# Altium PCB LTE-Module.PcbDoc (part 2 of 2)
Units mm, origin at the board's own origin, x right, y up, seen from the top; angles counter-clockwise.
Board outline 33 x 53 mm, 2 copper layers (Top Layer, Bottom Layer), stack 0.97 mm thick; 55 components, 48 nets, 277 pads, 102 vias.
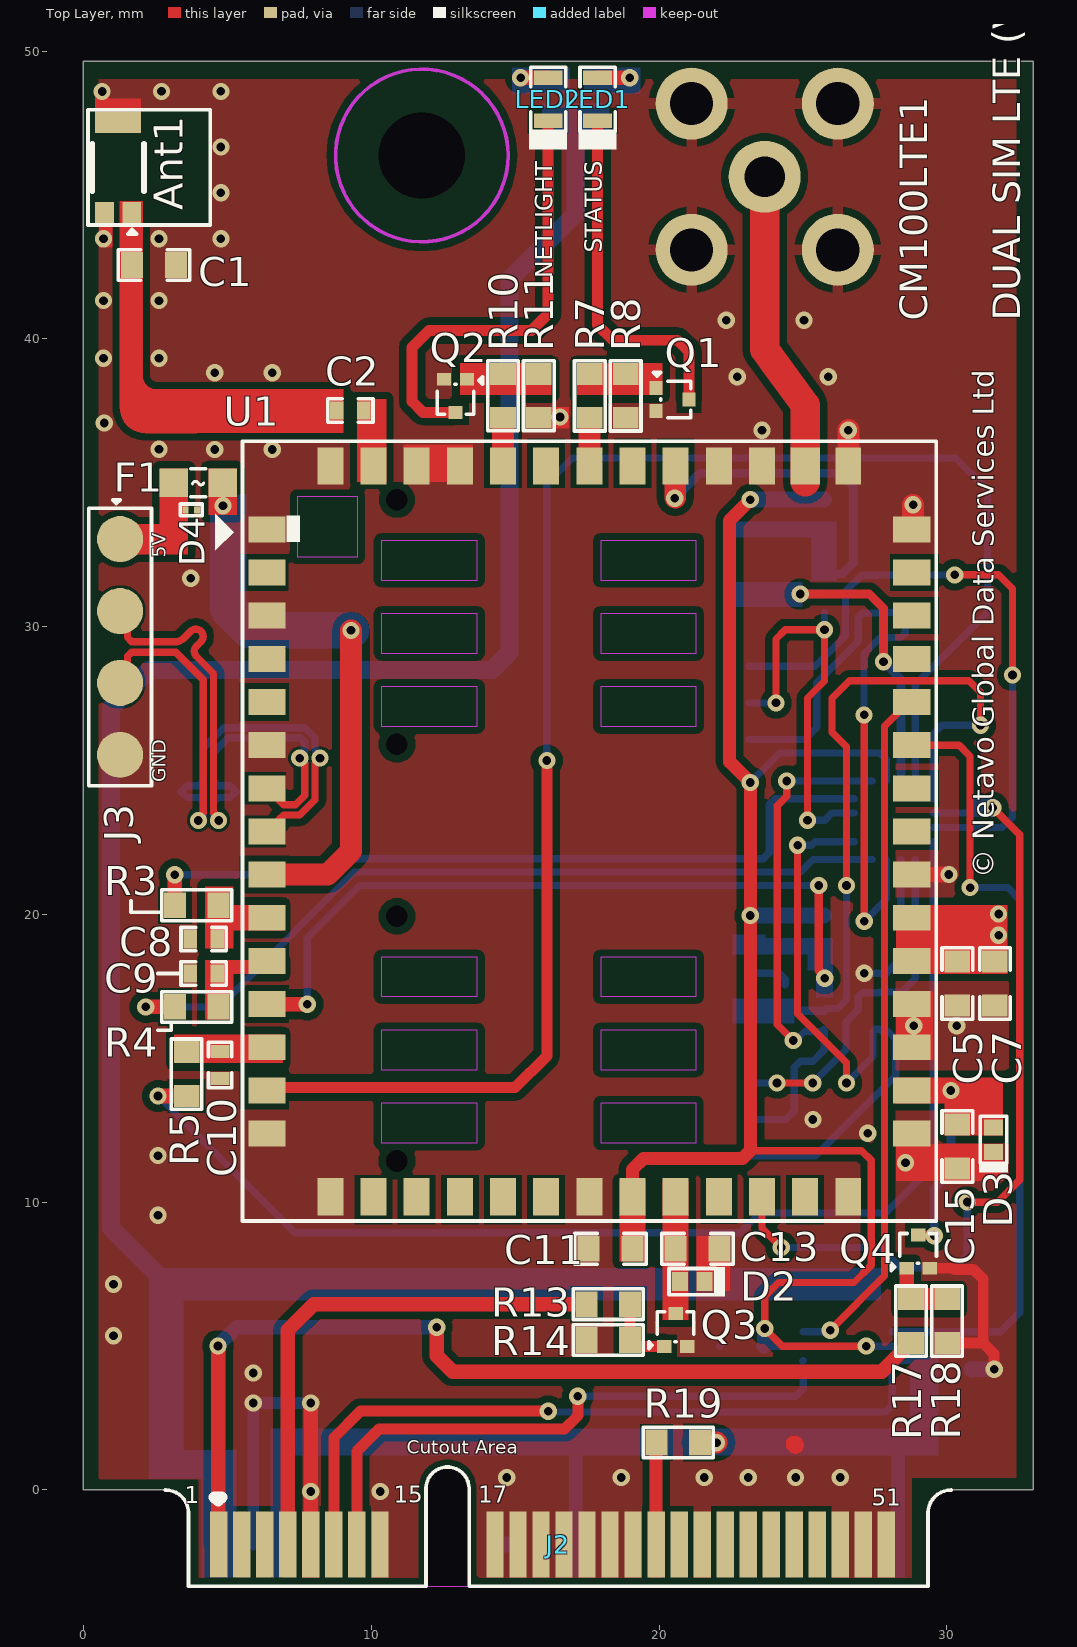
[diagram p0: Top Layer view]

## Via types
v1: diameter 0.6, hole 0.3, Top Layer to Bottom Layer, 102 vias

## Nets (pads, with @x,y where several pads share a name; then routed paths per layer and width w, separated by ;. In a path a pad name is that pad's centre, name@x,y a point inside that pad or via, vN(x,y) a via of type N, cw(c..) or ccw(c..) an arc to the next point about the centre after c; other vN are vias at no path point) (continued)
GND: (continued)
  other v1: 7.899,-0.051 10.312,-0.051 21.576,0.432 23.1,0.432 24.746,0.432 26.3,0.432 5.9,4.064 1.041,5.359 1.041,7.15 2.591,9.55 28.566,11.375 2.591,11.62 27.25,12.398 25.349,12.874 28.854,16.129 30.347,16.129 3.729,31.68 4.56,36.157 6.56,36.157 2.626,36.164 23.578,36.83 0.726,37.078 16.561,37.287 22.717,38.682 25.878,38.682 4.56,38.824 6.56,38.824 0.696,39.333 2.626,39.333 22.339,40.646 25.038,40.646 0.696,41.333 2.626,41.333 0.696,43.485 2.626,43.485 4.775,43.485 4.775,45.078 4.775,46.672 0.647,48.598 2.711,48.602 4.775,48.602
GNSS_ANT: Ant1.1 C1.2 C2.2
GSM_PWR: C5.2 C6.1 C7.1 D1.2 J2.2 R6.1 R9.1 U1.33 U1.34 | length 66.9
  Top Layer w0.254: 30.251,19.939 30.696,19.939 31.356,19.278 v1(31.801,19.278) 31.801,19.99 31.775,20.015 v1@31.801,20.041
  Bottom Layer w0.635: C6.1@12.001,7.15 9.144,7.15 2.845,7.15 2.591,7.404 2.591,7.466 0.952,9.104 0.952,27.181 2.271,28.499 14.199,28.499 14.808,29.108 14.808,42.062 17.109,44.363 17.109,46.979 16.737,47.351 16.523,47.351 R9.1
  other v1: 31.801,20.015
GSM_PWR_EN: J2.1 R17.1 | length 32.9
  Top Layer w0.508: v1(4.674,5.004) 4.687,4.991 4.687,-1.887 J2.1 ; v1(12.276,5.657) 12.276,4.666 12.827,4.115 27.746,4.115 28.566,4.935 28.566,4.978 28.693,5.105 R17.1
  Bottom Layer w0.508: v1(4.674,5.004) 5.327,5.657 v1(12.276,5.657)
GSM_RST: J2.7 R13.1 | length 18.2
  Top Layer w0.508: J2.7 7.1,5.551 8.007,6.457 R13.1
GSM_RX: U1.39 U5.4 | length 24
  Top Layer w0.254: v1(25.951,5.554) 27.838,7.441 27.838,26.544 28.678,27.384 U1.39
  Bottom Layer w0.254: U5.4 25.897,5.5 v1(25.951,5.554)
GSM_TX: U1.38 U5.5 | length 27.7
  Top Layer w0.254: U1.38@28.779,25.883 30.429,25.883 30.81,25.502 v1(30.81,20.934)
  Bottom Layer w0.254: U5.5 31.87,5.5 32.537,6.167 32.537,20.512 32.116,20.934 v1(30.81,20.934)
GSM_USB_D_N: D5.2 J3.2 U1.7 | length 21.6
  Top Layer w0.254: J3.2 1.528,30.288 1.528,29.622 1.676,29.473 2.995,29.473 3.175,29.473 ccw(c3.175,29.907) 3.481,29.6 3.723,29.841 cw(c3.902,29.662) 4.082,29.841 cw(c3.903,29.662) 4.082,29.482 3.926,29.326 ccw(c4.106,29.147) 3.926,28.967 4.483,28.41 4.521,28.372 4.521,23.533 4.694,23.36 v1(4.694,23.266) ; U1.7 6.478,24.384 6.801,24.061 6.801,23.961 6.95,23.812 7.37,23.812 7.691,24.134 7.691,25.261 v1(7.518,25.434)
  Bottom Layer w0.254: v1(4.694,23.266) 4.521,23.439 4.521,23.915 4.67,24.063 5.09,24.063 D5.2 5.09,24.469 4.67,24.469 4.521,24.618 4.521,25.632 5.026,26.137 7.543,26.137 7.691,25.988 7.691,25.701 7.518,25.528 v1(7.518,25.434)
GSM_USB_D_P: D5.1 J3.3 U1.8 | length 21.6
  Top Layer w0.254: J3.3 1.528,28.303 1.528,28.969 1.676,29.118 3.205,29.118 4.166,28.157 4.166,23.533 3.993,23.36 v1(3.993,23.266) ; U1.8 6.478,22.884 6.801,23.207 6.801,23.307 6.95,23.456 7.517,23.456 8.047,23.986 8.047,25.261 v1(8.22,25.434)
  Bottom Layer w0.254: v1(3.993,23.266) 4.166,23.439 4.166,23.915 4.017,24.063 3.596,24.063 D5.1 3.596,24.469 4.017,24.469 4.166,24.618 4.166,25.78 4.878,26.492 7.69,26.492 8.047,26.135 8.047,25.701 8.22,25.528 v1(8.22,25.434)
MCU_RX: J2.11 U5.8 | length 24.7
  Top Layer w0.381: J2.11 8.7,1.817 9.624,2.74 v1(16.149,2.74)
  Bottom Layer w0.254: v1(16.149,2.74) 16.183,2.707 27.878,2.707 28.111,2.939 U5.8
MCU_TX: J2.13 U5.1 | length 20.5
  Top Layer w0.381: J2.13 9.5,1.36 10.263,2.123 16.722,2.123 17.18,2.581 v1(17.18,3.261)
  Bottom Layer w0.254: v1(17.18,3.261) 24.759,3.261 25.011,3.513 U5.1
NetC2_1: C2.1 U1.55
NetC8_2: C8.2 R3.2 U1.10 | length 0
  Top Layer w0.381: U1.10@6.376,19.886 U1.10
NetC9_2: C9.2 R4.1 U1.11
NetC10_2: C10.2 R5.2 U1.13 | length 1.5
  Top Layer w0.381: C10.2@4.902,15.418 6.344,15.418 U1.13
NetD4_1: D4.1 F1.2 J3.1
NetLED1_1: LED1.1 R6.2 | length 1.6
  Top Layer w0.508: LED1.1 v1(18.981,49.079)
  Bottom Layer w0.508: 18.479,49.079 v1(18.981,49.079)
NetLED1_2: LED1.2 Q1.3 | length 12.3
  Top Layer w0.381: LED1.2 17.866,40.483 18.395,39.954 20.649,39.954 21.04,39.564 Q1.3
NetLED2_1: LED2.1 R9.2 | length 1
  Top Layer w0.508: v1@15.189,49.083 15.191,49.081 16.146,49.081 LED2.1
  other v1: 15.189,49.079
NetLED2_2: LED2.2 Q2.3 | length 15.4
  Top Layer w0.381: Q2.3@12.904,37.449 11.802,37.449 11.418,37.833 11.418,39.704 12.007,40.294 15.569,40.294 16.148,40.873 LED2.2
NETLIGHT: R10.1 U1.52 | length 1.7
  Top Layer w0.762: U1.52@14.58,35.585 R10.1
NetQ1_1: Q1.1 R7.2 R8.2 | length 2.1
  Top Layer w0.508: R7.2 R8.2 18.966,38.658 19.592,38.658
NetQ2_1: Q2.1 R10.2 R11.2
NetQ3_1: Q3.1 R13.2 R14.2 | length 2.5
  Top Layer w0.381: R13.2 R14.2 18.999,5.178 19.19,4.988 Q3.1
NetQ4_1: Q4.1 R17.2 R18.2
PWRKEY: C15.2 D3.2 Q4.3 U1.30 | length 7.2
  Top Layer w0.305: U1.30 v1(30.144,13.884) ; Q4.3 29.015,8.847 29.557,8.847 v1(29.566,8.839)
  Bottom Layer w0.305: v1(29.566,8.839) 29.566,10.484 30.144,11.062 v1(30.144,13.884)
RF_ANT: J1.1 U1.45 | length 11.1
  Top Layer w1.016: J1.1 23.673,40.131 23.673,39.635 23.965,39.234 25.078,37.704 U1.45 U1.45@25.078,35.034
RST_GSM: C13.2 D2.2 Q3.3 U1.24 | length 4.5
  Top Layer w0.305: 20.443,7.239 20.458,7.239 ; Q3.3 D2.2@20.578,7.449 ; U1.24 20.578,7.569 ; 20.733,7.569 20.578,7.569 ; D2.2@20.578,7.449 20.578,7.569 ; D2.2@20.578,7.449 20.458,7.569 20.578,7.569
SIM_CD_B1: J5.CD R1.2 U1.12 U3.6 | length 25.5
  Top Layer w0.305: v1(25.552,21.006) 25.552,18.063 25.756,17.86 v1(25.756,17.78)
  Top Layer w0.508: U1.12 v1(7.778,16.884)
  Bottom Layer w0.254: v1(7.778,16.884) 7.778,19.182 9.601,21.006 v1(25.552,21.006)
SIM_CD_B2: J4.CD R2.2 U1.48 U4.6 | length 11.8
  Top Layer w0.381: v1(20.549,34.468) v1@20.563,34.483 ; U1.48@20.563,35.569 U1.48
  Top Layer w0.762: v1@20.563,34.483 U1.48@20.563,35.569
  Bottom Layer w0.305: v1(20.549,34.468) 21.415,35.334 26.301,35.334 26.757,34.878 26.757,32.217 26.377,31.838 25.798,31.838 U4.6
  Bottom Layer w0.381: J4.CD@23.067,33.438 J4.CD
SIM_CLK: R4.2 U2.8 | length 28.4
  Top Layer w0.508: v1(2.167,16.787) R4.2
  Bottom Layer w0.254: v1(2.167,16.787) 4.722,16.787 9.412,21.477 24.923,21.477 25.354,21.908 U2.8
SIM_CLK_B1: J5.C3 U2.9 U3.3 | length 21.7
  Top Layer w0.254: v1(24.816,22.403) 24.816,16.546 26.518,14.845 v1(26.518,14.144)
  Bottom Layer w0.254: J5.C3 25.432,11.604 28.233,14.404 28.233,15.673 27.972,15.933 27.757,15.933 U3.3 27.509,16.006 27.436,15.933 27.436,15.062 v1(26.518,14.144) ; v1(24.816,22.403) 25.3,22.403 25.42,22.523 U2.9
SIM_CLK_B2: J4.C3 U2.7 U4.3 | length 22.5
  Top Layer w0.254: v1@27.127,26.687 27.127,19.766 v1(27.132,19.761)
  Bottom Layer w0.254: J4.C3 25.07,26.082 25.486,26.499 25.486,28.052 26.923,29.489 26.923,30.329 27.072,30.478 27.679,30.478 U4.3 28.398,30.49 28.555,30.333 28.555,29.777 28.405,29.627 27.691,29.627 27.127,29.063 v1(27.127,26.934) ; v1(27.132,19.761) 27.132,19.766 27.902,20.536 27.902,21.905 U2.7
SIM_DATA: R3.1 U2.12 | length 26.7
  Top Layer w0.508: R3.1 v1(3.175,21.384)
  Bottom Layer w0.254: v1(3.175,21.384) 8.608,21.384 9.16,21.937 23.625,21.937 23.832,22.144 23.832,23.812 24.043,24.023 U2.12
SIM_DATA_B1: J5.C7 U2.13 U3.4 | length 18.8
  Top Layer w0.254: v1(24.435,24.638) 24.435,24.105 24.108,23.778 24.108,16.176 v1(24.663,15.621)
  Bottom Layer w0.254: J5.C7 24.404,12.874 24.695,13.165 24.695,14.69 24.904,14.899 25.349,14.899 25.744,15.295 U3.4 25.671,15.933 25.059,15.933 24.747,15.621 v1(24.663,15.621) ; v1(24.435,24.638) U2.13
SIM_DATA_B2: J4.C7 U2.11 U4.4 | length 14.2
  Top Layer w0.254: v1(24.067,27.352) 24.067,29.575 24.384,29.892 v1(25.752,29.892) 25.752,28.114 25.159,27.521 v1(25.159,23.273)
  Bottom Layer w0.254: J4.C7 v1(24.067,27.352) ; v1(25.159,23.273) 25.756,23.273 26.006,23.523 U2.11 ; v1(25.752,29.892) U4.4
SIM_RST: R5.1 U2.4 | length 42.1
  Top Layer w0.508: v1(2.591,13.691) R5.1
  Bottom Layer w0.254: v1(2.591,13.691) 7.341,8.941 22.819,8.941 23.507,9.629 27.882,9.629 29.52,11.267 U2.4
SIM_RST_B1: J5.C2 U2.5 U3.1 | length 12.2
  Top Layer w0.254: v1(24.101,14.144) v1(25.344,14.144)
  Bottom Layer w0.254: J5.C2 v1(24.101,14.144) ; v1(25.344,14.144) 26.495,15.295 26.495,16.262 26.927,16.693 26.927,17.135 27.076,17.284 27.662,17.284 U3.1 28.438,17.306 28.905,17.773 U2.5
SIM_RST_B2: J4.C2 U2.3 U4.1 | length 22.4
  Top Layer w0.254: v1(30.277,31.801) 31.801,31.801 32.283,31.318 v1(32.283,28.321)
  Bottom Layer w0.254: J4.C2 25.422,28.622 26.481,29.681 26.481,31.229 27.043,31.79 U4.1 27.696,31.796 30.272,31.796 v1(30.277,31.801) ; U2.3 31.933,23.023 32.283,23.373 v1(32.283,28.321)
SIM_SELECT: R12.1 U1.26 U2.2 | length 28.5
  Top Layer w0.254: U1.26 23.578,9.1 v1(24.252,8.426) ; v1(30.709,10.008) 30.713,10.003 31.761,10.003 32.537,10.78 32.537,22.765 v1(31.598,23.705)
  Bottom Layer w0.254: v1(24.252,8.426) 27.703,8.426 28.403,7.726 30.279,7.726 30.709,8.156 v1(30.709,10.008) ; U2.2 30.996,23.523 R12.1@31.07,23.597
  Bottom Layer w0.635: R12.1 v1(31.598,23.705)
SIM_VCC_B1: C12.2 J5.C1 U2.1 U3.5 | length 23.7
  Top Layer w0.254: v1(26.518,21.006) 26.518,25.831 26.014,26.334 26.014,27.513 26.619,28.118 30.774,28.118 31.171,27.721 v1(31.171,26.576)
  Bottom Layer w0.254: U3.5 25.817,16.729 26.2,16.729 26.518,17.047 v1(26.518,21.006) ; U2.1 29.52,26.269 29.827,26.576 v1(31.171,26.576)
  Bottom Layer w0.305: C12.2@24.39,16.656 U3.5
SIM_VCC_B2: C14.2 J4.C1 U2.15 U4.5 | length 10.7
  Top Layer w0.305: v1(24.908,31.135) 27.303,31.135 27.801,30.637 v1(27.801,28.782)
  Bottom Layer w0.305: C14.2@24.384,31.128 24.908,31.128 24.915,31.134 25.744,31.134 U4.5 ; v1(27.801,28.782) 28.405,28.177 U2.15
SIM_VDD: U1.14 U2.16 | length 57.4
  Top Layer w0.381: U1.14@6.378,13.986 15.002,13.986 16.104,15.088 v1(16.104,25.349)
  Bottom Layer w0.254: v1(16.104,25.349) 16.104,34.976 16.993,35.865 30.302,35.865 31.412,34.755 31.412,30.498 28.905,27.991 U2.16
STATUS: R7.1 U1.50 | length 1.7
  Top Layer w0.762: U1.50 R7.1@17.578,37.244
TYPE2: J2.31 R19.1 | length 0
  Top Layer w0.508: R19.1@19.9,1.643 R19.1
USB_VBUS: F1.1 U1.9 | length 18.8
  Top Layer w0.762: U1.9 8.481,21.384 9.296,22.2 v1(9.296,29.872)
  Bottom Layer w1.27: 5.029,33.934 5.029,30.607 5.764,29.872 v1(9.296,29.872)
  other v1: 4.848,34.205
VDD_EXT: C11.2 C16.2 R1.1 R2.1 U1.23 U2.14 U5.3 U5.6 | length 59.5
  Top Layer w0.254: 23.175,11.792 27.039,11.792 27.376,11.455 27.376,7.81 26.778,7.212 24.16,7.212 23.675,6.727 v1(23.675,5.611) 24.286,5 v1(27.2,5)
  Top Layer w0.457: U1.23 19.078,11.139 19.463,11.524 22.907,11.524 23.175,11.792 v1(23.175,19.964) v1(23.175,24.587) 22.454,25.308 22.454,33.696 v1(23.175,34.417)
  Bottom Layer w0.254: v1(23.175,24.587) 24.197,25.61 27.674,25.61 27.905,25.379 U2.14 ; C16.2@23.747,5 U5.3 ; v1(27.2,5) U5.6
  Bottom Layer w0.508: C16.2@23.647,5.002 23.66,5.015 v1@23.66,5.611
  Bottom Layer w0.559: v1@23.154,34.417 v1(23.175,34.417) R2.1 ; v1(23.175,19.964) R1.1 R1.1@25.73,19.964
pads on no net: J2.3 J2.5 J2.8 J2.10 J2.12 J2.14 J2.16 J2.20 J2.22 J2.30 J2.32 J2.33 J2.36 J2.37 J2.38 J2.39 J2.41 J2.43 J2.45 J2.46 J2.48 J4.C6 J4.MH J5.C6 J5.MH U1.2 U1.4 U1.5 U1.17 U1.18 U1.19 U1.20 U1.21 U1.25 U1.27 U1.36 U1.37 U1.40 U1.41 U1.42 U1.49 U1.51 U2.10 U2.17

## Polygon pours and split planes (outlines as drawn)
GND on Bottom Layer "NONET_L02_P-001" (solid, remove dead copper, pour order 1): 0.534,0.381 4.013,0.381 4.013,-3.05 28.778,-3.05 28.778,0.432 32.41,0.432 32.41,49.022 0.534,49.022
GSM_PWR on Bottom Layer "GSM_PWR_L02_P002" (solid, pour order 2): 27.076,7.722 29.875,7.722 31.205,9.051 31.205,20.32 32.131,20.32 32.131,6.579 27.076,6.579
GND on Top Layer "NONET_L02_P-001" (solid, remove dead copper, pour order 0): 0.534,0.406 0.559,0.381 4.013,0.381 4.013,-3.05 28.778,-3.05 28.778,0.432 32.411,0.432 32.411,49.022 0.534,49.022

## Keep-outs
Keep-Out Layer:
  circle w0.127: c11.759,46.376 r3

## Other copper
Top Layer:
  rectangle net USB_VBUS: 4.338,33.884 5.338,35.501
  rectangle net NetD4_1: 2.638,32.507 3.638,35.501
  region net NetQ2_1: 16.269,39.167 13.079,39.167 13.079,38.048 16.269,38.048
  rectangle net NetD4_1: 0.675,32.507 3.638,33.57
  rectangle net GND: 28.228,14.934 29.528,17.334
  rectangle net NetC9_2: 4.216,17.934 6.928,18.417
  rectangle net TYPE2: 19.676,-3.05 20.127,1.814
  rectangle net GND: 0.405,47.161 0.889,48.768
  rectangle net GNSS_ANT: 2.626,36.728 9.03,38.252
  rectangle net NetQ4_1: 28.321,6.248 30.455,7.01
  rectangle net NetQ4_1: 28.357,6.517 28.857,7.93
  rectangle net VDD_EXT: 18.628,7.938 19.533,10.734
  rectangle net GND: 21.308,6.909 22.479,8.826
  rectangle net RST_GSM: 20.113,5.913 21.031,10.734
  rectangle net GND: 28.228,10.734 31.953,12.019
  rectangle net PWRKEY: 28.228,13.434 31.229,14.334
  rectangle net PWRKEY: 29.921,12.315 31.953,14.334
  rectangle net GND: 0.534,43.18 1.002,44.761
  rectangle net GND: 0.405,47.161 2.005,48.362
  rectangle net GND: 15.38,36.881 16.866,37.643
  rectangle net GSM_PWR: 28.228,17.934 32.118,20.334
  rectangle net NetC10_2: 3.137,14.834 6.928,15.834
  region net NetC8_2: 5.22,20.979 4.216,20.979 4.216,18.824 5.22,18.824
  region net NetC9_2: 5.22,18.417 4.216,18.417 4.216,16.342 5.22,16.342
  rectangle net NetC8_2: 4.318,19.434 6.928,20.334
  rectangle net GND: 11.128,35.034 13.528,36.334
  rectangle net NetC2_1: 9.503,35.035 10.528,37.911
  rectangle net NetQ1_1: 17.15,38.047 20.115,39.166
  region net GNSS_ANT: 1.261,44.78 1.261,37.619 ccw(c2.152,37.619) 2.152,36.728 3.944,36.728 3.944,37.989 ccw(c3.681,37.989) 3.681,38.252 2.536,38.252 cw(c2.536,38.727) 2.061,38.727 2.061,44.78
  pour cut-out: 0.155,47.961 0.155,43.961 4.405,43.961 4.405,47.961
Bottom Layer:
  rectangle net GSM_PWR: 2.274,6.579 27.711,7.722
  rectangle net GSM_PWR: 2.274,0.381 3.48,7.722
  rectangle net GSM_PWR: 2.311,0.381 5.309,1.397
  rectangle net SIM_CD_B1: 25.159,18.059 26.045,19.177
  rectangle net SIM_CD_B1: 22.553,18.606 26.045,19.177
  rectangle net 3V3: 28.314,4.384 29.337,4.624
  region net NetLED2_1: 16.904,49.427 14.884,49.427 14.884,48.514 16.904,48.514
  rectangle net GSM_PWR: 4.095,-3.05 5.309,1.197
  rectangle net 3V3: 28.714,1.197 29.718,4.65
  rectangle net 3V3: 28.06,-3.05 28.549,1.93
  rectangle net 3V3: 16.876,-3.05 17.341,2.108
  rectangle net 3V3: 6.502,-3.05 6.909,2.134
  rectangle net USB_VBUS: 4.398,32.545 5.665,34.595
  region net GSM_PWR: 18.275,48.177 15.926,48.177 15.926,46.927 18.275,46.927
  rectangle net NetLED1_1: 17.386,48.514 19.355,49.427
  rectangle net SIM_CD_B1: 22.553,18.631 23.693,19.304
  rectangle net SIM_CD_B1: 25.464,17.113 26.045,19.177
  rectangle net SIM_VCC_B1: 22.553,16.212 24.702,17.084
  rectangle net SIM_CD_B2: 22.553,33.1 26.175,33.661
  rectangle net SIM_CD_B2: 25.286,31.59 26.175,33.274
  rectangle net SIM_VCC_B2: 22.555,30.69 24.988,31.562
  rectangle net 3V3: 6.502,1.197 29.718,2.134
  pour cut-out: 0.155,47.961 0.155,43.961 4.405,43.961 4.405,47.961

## Silkscreen, mask and mechanical layers (free items; w line width, h text height)
Top Overlay:
  lines w0.127: 1.651,20.472 1.651,20.072 2.718,20.072 ; 2.591,15.977 3.048,15.977 3.048,16.253 ; 2.591,17.948 3.391,17.948 ; 0.155,43.961 4.405,43.961 4.405,47.961 0.155,47.961 0.155,43.961
  text "STATUS" at 18.218,43.002 h1.02 r90
  text "NETLIGHT" at 16.498,42.113 h1.02 r90
  text "CM100LTE1" at 29.653,40.64 h1.65 r90
  text "DUAL SIM LTE (V0.9)" at 32.879,40.64 h1.65 r90
  text "5V" at 3.018,32.397 h0.8 r90
  text "GND" at 3.017,24.6 h0.8 r90
  text "© Netavo Global Data Services Ltd" at 31.877,21.26 h1.27 r90
Bottom Overlay:
  drawing of 27 lines, arcs and shapes, not listed
  text "6.05(mm)" at 14.656,48.344 h1.52
  text "11.38(mm)" at 0.769,39.827 h1.52 r270
  text "Serial" at 4.89,39.323 h1.65 r270
  text "LTE_Module-v2.0" at 31.064,34.087 h1.02 r270
  text "SIM-A" at 5.467,25.933 h2.5 r270
  text "SIM-B" at 5.467,11.43 h2.5 r270
  text "2" at 5.573,-0.647 h1
  text "14" at 11.595,-0.647 h1
  text "18" at 15.173,-0.647 h1
  text "52" at 28.77,-0.647 h1
Dimensions:
  lines w0.254: 11.9,0.051 11.9,-3.2 11.901,0.051 ; 13.401,-3.2 13.401,0.051
Board Outline:
  the board outline again, w0.127
Fabrication:
  drawing of 191 lines, arcs and shapes, not listed
  text "Layer" at 44.351,60.249 h1.52
  text "Name" at 54.762,60.249 h1.52
  text "Material" at 78.378,60.249 h1.52
  text "Thickness" at 100.216,60.249 h1.52
  text "Constant" at 116.722,60.249 h1.52
  text "Board Layer Stack" at 131.196,60.249 h1.52
  text "Top Overlay" at 54.762,57.201 h1.52
  text "Top Solder" at 54.762,54.153 h1.52
  text "Solder Resist" at 78.378,54.153 h1.52
  text "0.59mil" at 100.216,54.153 h1.52
  text "3.8" at 116.722,54.153 h1.52
  text "1" at 44.351,51.105 h1.52
  text "Top Layer" at 54.762,51.105 h1.52
  text "1.38mil" at 100.216,51.105 h1.52
  text "Dielectric 1" at 54.762,48.057 h1.52
  text "FR4" at 78.378,48.057 h1.52
  text "35.43mil" at 100.216,48.057 h1.52
  text "4.8" at 116.722,48.057 h1.52
  text "2" at 44.351,45.009 h1.52
  text "Bottom Layer" at 54.762,45.009 h1.52
  text "1.38mil" at 100.216,45.009 h1.52
  text "Bottom Solder" at 54.762,41.961 h1.52
  text "Solder Resist" at 78.378,41.961 h1.52
  text "0.59mil" at 100.216,41.961 h1.52
  text "3.8" at 116.722,41.961 h1.52
  text "Bottom Overlay" at 54.762,38.913 h1.52
Drill Drawing:
  circle w0.254: c2.581,72.081 r0.847
  lines w0.254: 1.735,75.044 2.581,75.468 3.428,75.044 3.005,75.891 3.428,76.738 2.581,76.314 1.735,76.738 2.158,75.891 1.735,75.044 ; 1.735,78.854 3.428,78.854 3.428,80.548 1.735,80.548 1.735,78.854 ; 1.735,83.088 2.158,83.088 2.158,82.664 3.005,82.664 3.005,83.088 3.428,83.088 3.428,83.934 3.005,83.934 3.005,84.358 2.158,84.358 2.158,83.934 1.735,83.934 1.735,83.088 ; 1.735,88.168 3.428,88.168 2.581,86.474 1.735,88.168
  lines w0.381: 0.216,70.091 324.433,70.091 ; 0.216,89.141 324.433,89.141 ; 14.208,66.281 14.208,92.951 ; 28.936,66.281 28.936,92.951 ; 57.376,66.281 57.376,92.951 ; 70.225,66.281 70.225,92.951 ; 88.864,66.281 88.864,92.951 ; 126.952,66.281 126.952,92.951 ; 141.935,66.281 141.935,92.951 ; 160.878,66.281 160.878,92.951 ; 177.383,66.281 177.383,92.951 ; 199.069,66.281 199.069,92.951 ; 232.943,66.281 232.943,92.951 ; 266.816,66.281 266.816,92.951 ; 288.807,66.281 288.807,92.951 ; 0.216,66.281 324.433,66.281 324.433,92.951 0.216,92.951 0.216,66.281
  text "Symbol" at 2.502,90.284 h1.83
  text "Count" at 15.351,90.284 h1.83
  text "Hole Size" at 30.079,90.284 h1.83
  text "Plated" at 58.519,90.284 h1.83
  text "Hole Type" at 71.368,90.284 h1.83
  text "Drill Layer Pair" at 90.007,90.284 h1.83
  text "Via/Pad" at 128.095,90.284 h1.83
  text "Pad Shape" at 143.078,90.284 h1.83
  text "Template" at 162.021,90.284 h1.83
  text "Description" at 178.526,90.284 h1.83
  text "Hole Tolerance (+)" at 200.212,90.284 h1.83
  text "Hole Tolerance (-)" at 234.086,90.284 h1.83
  text "Hole Length" at 267.959,90.284 h1.83
  text "Routed Path Length" at 289.95,90.284 h1.83
  text "1" at 15.351,86.474 h1.52
  text "1.400mm (55.12mil)" at 30.079,86.474 h1.52
  text "PTH" at 58.519,86.474 h1.52
  text "Round" at 71.368,86.474 h1.52
  text "Top Layer - Bottom Layer" at 90.007,86.474 h1.52
  text "Pad" at 128.095,86.474 h1.52
  text "Rounded" at 143.078,86.474 h1.52
  text "c250h140" at 162.021,86.474 h1.52
  text "-" at 267.959,86.474 h1.52
  text "-" at 289.95,86.474 h1.52
  text "1" at 15.351,82.664 h1.52
  text "3.000mm (118.11mil)" at 30.079,82.664 h1.52
  text "NPTH" at 58.519,82.664 h1.52
  text "Round" at 71.368,82.664 h1.52
  text "Top Layer - Bottom Layer" at 90.007,82.664 h1.52
  text "Pad" at 128.095,82.664 h1.52
  text "Rounded" at 143.078,82.664 h1.52
  text "c0hn300" at 162.021,82.664 h1.52
  text "-" at 267.959,82.664 h1.52
  text "-" at 289.95,82.664 h1.52
  text "4" at 15.351,78.854 h1.52
  text "0.750mm (29.53mil)" at 30.079,78.854 h1.52
  text "NPTH" at 58.519,78.854 h1.52
  text "Round" at 71.368,78.854 h1.52
  text "Top Layer - Bottom Layer" at 90.007,78.854 h1.52
  text "Pad" at 128.095,78.854 h1.52
  text "Rectangle" at 143.078,78.854 h1.52
  text "s0hn75" at 162.021,78.854 h1.52
  text "-" at 267.959,78.854 h1.52
  text "-" at 289.95,78.854 h1.52
  text "4" at 15.351,75.044 h1.52
  text "1.500mm (59.06mil)" at 30.079,75.044 h1.52
  text "PTH" at 58.519,75.044 h1.52
  text "Round" at 71.368,75.044 h1.52
  text "Top Layer - Bottom Layer" at 90.007,75.044 h1.52
  text "Pad" at 128.095,75.044 h1.52
  text "Rounded" at 143.078,75.044 h1.52
  text "c250h150" at 162.021,75.044 h1.52
  text "-" at 267.959,75.044 h1.52
  text "-" at 289.95,75.044 h1.52
  text "102" at 15.351,71.234 h1.52
  text "0.300mm (11.81mil)" at 30.079,71.234 h1.52
  text "PTH" at 58.519,71.234 h1.52
  text "Round" at 71.368,71.234 h1.52
  text "Top Layer - Bottom Layer" at 90.007,71.234 h1.52
  text "Via" at 128.095,71.234 h1.52
  text "Rounded" at 143.078,71.234 h1.52
  text "v60h30" at 162.021,71.234 h1.52
  text "-" at 267.959,71.234 h1.52
  text "-" at 289.95,71.234 h1.52
  text "112 Total" at 15.351,67.424 h1.52

## Dimensions
2.642,49.455 to 8.687,49.454 on Bottom Overlay
2.642,49.455 to 2.642,38.075 on Bottom Overlay
0,49.642 to 33,49.642 on Dimensions
29.35,-3.355 to 33,49.642 on Dimensions

## Text inside footprints (layer, text, board x,y; h text height)
J1: Bottom Overlay "PCB EDGE" at 24.807,48.541 h0.3
J2: Top Overlay "15" at 10.788,-0.642 h1; Top Overlay "1" at 3.515,-0.653 h1; Top Overlay "17" at 13.725,-0.642 h1; Top Overlay "51" at 27.395,-0.733 h1; Top Overlay "Cutout Area" at 11.237,1.096 h0.8
J4: Bottom Overlay "Board Edge" at 9.373,27.178 h0.76 r270
J5: Bottom Overlay "Board Edge" at 9.195,12.675 h0.76 r270